# Altium PCB PCB1.PcbDoc (part 2 of 2)
Units mm, origin at the board's own origin, x right, y up, seen from the top; angles counter-clockwise.
Board outline 90 x 58.77 mm, 6 copper layers (L1, GND1, +3V3, 1.8V, GND, L6), stack 1.776 mm thick; 134 components, 89 nets, 660 pads, 134 vias.
Unrouted connection lines stored in the file: 40.
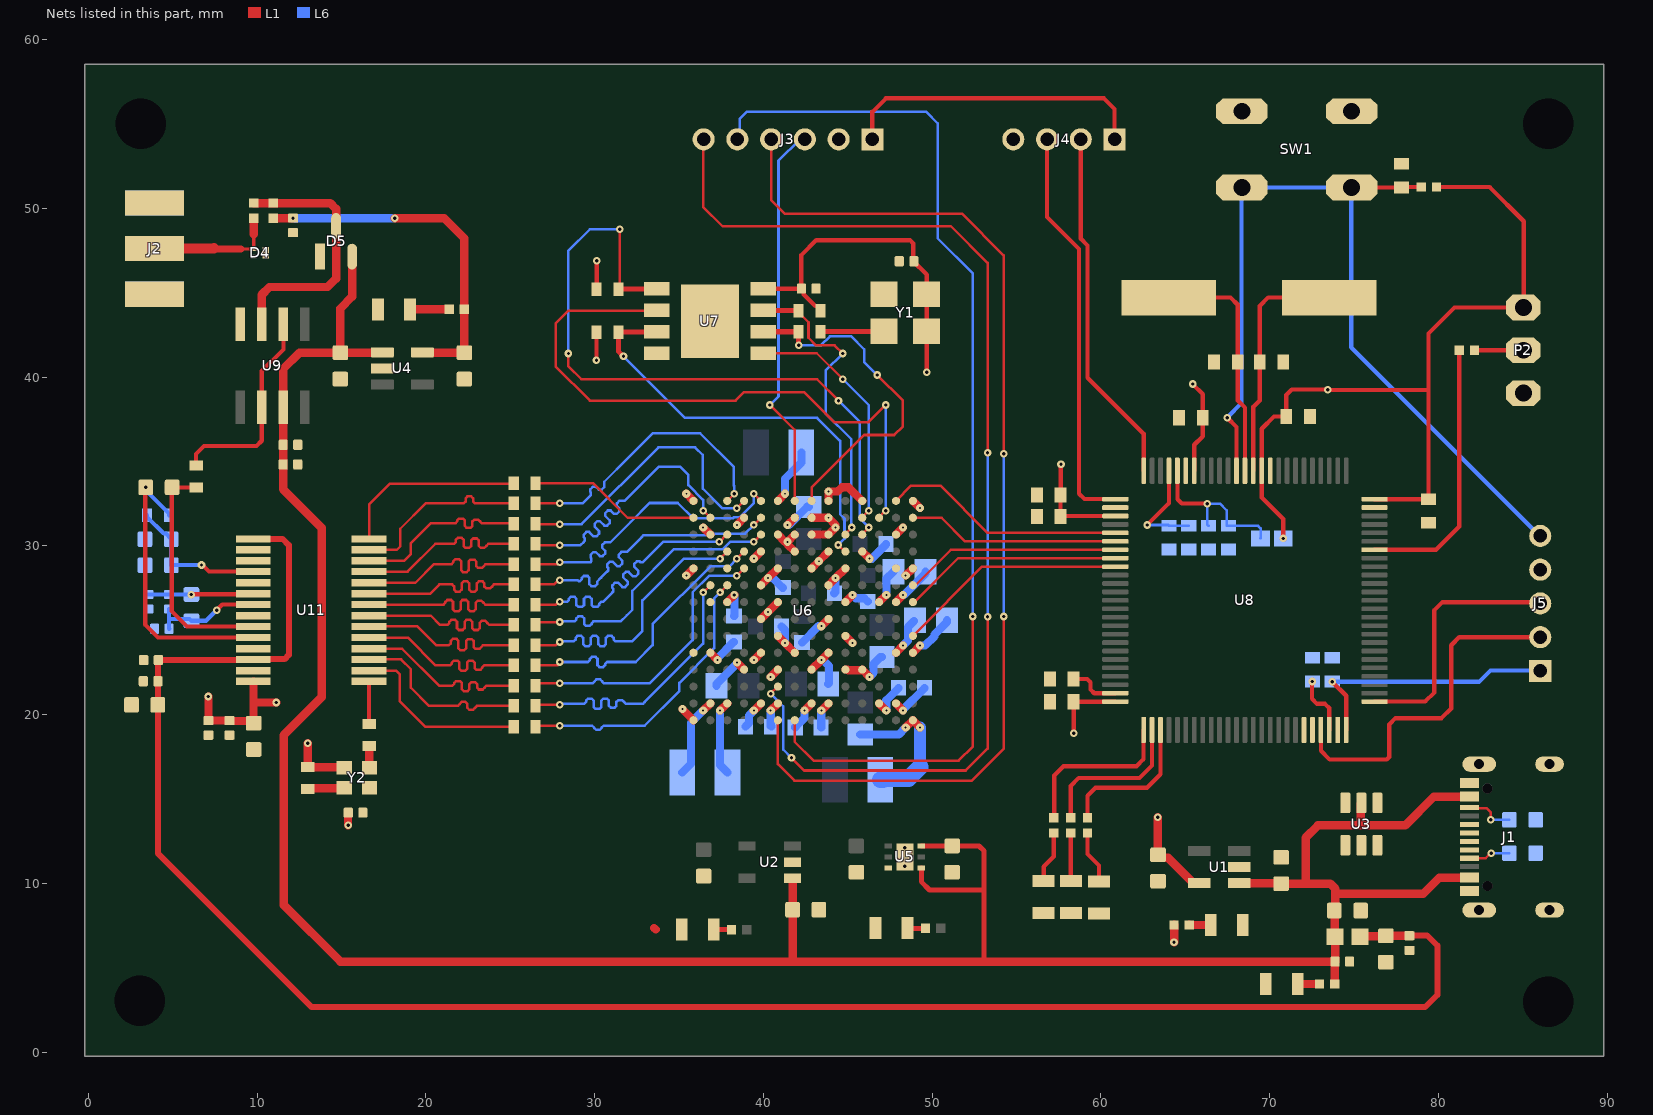
[diagram p6: the nets of this part, all layers, seen from the top]

## Via types
v1: diameter 0.45, hole 0.2, L1 to L6, 77 vias
v2: diameter 0.483, hole 0.114, L1 to L6, 57 vias

## Nets (pads, with @x,y where several pads share a name; then routed paths per layer and width w, separated by ;. In a path a pad name is that pad's centre, name@x,y a point inside that pad or via, vN(x,y) a via of type N, cw(c..) or ccw(c..) an arc to the next point about the centre after c; other vN are vias at no path point) (continued)
+3V3: C9.2 C26.2 C27.2 C28.2 C29.2 C30.2 C31.2 C32.2 C33.2 C34.2 C40.2 C41.2 C42.2 C48.2 C53.1 C54.1 C55.1 C56.1 C57.1 C58.1 C59.1 FB2.2 J3.1 J4.1 J5.1 P2.1 R3.2 R4.2 R5.2 R22.1 R27.1 R33.2 U1.5 U6.G2 U6.G13 U6.K2 U6.K13 U6.N2 U6.N6 U6.N8 U6.N13 U7.8 U8.11 U8.19 U8.28 U8.50 U8.75 U8.100 U11.28 Y1.1 Y1.4 Y2.4 | length 160.4
  L1 w0.254: Y2.4@15.136,16.896 Y2.4@15.159,16.873 ; v1(30.107,40.996) R4.2@30.107,42.671 ; R5.2@30.107,45.221 30.12,45.234 30.12,46.884 v1(30.132,46.896) ; U7.8@39.982,45.231 39.997,45.246 C33.2@42.25,45.246 ; R3.2@43.382,43.946 43.382,44.046 43.209,44.219 43.072,44.219 42.393,44.898 42.393,45.103 C33.2@42.25,45.246 ; J3.1@46.457,54.096 46.457,55.721 47.257,56.521 60.182,56.521 60.807,55.896 J4.1@60.807,54.096 ; v1(49.682,40.296) 49.682,42.716 Y1.4@49.677,42.721 Y1.1@49.677,44.921 49.677,46.078 48.882,46.873 48.882,47.921 48.682,48.121 43.132,48.121 42.25,47.239 C33.2@42.25,45.246 ; v1(57.632,34.846) 57.619,34.833 57.619,33.033 C59.1@57.607,33.021 C57.1@57.607,31.746 57.637,31.776 U8.28@60.852,31.776 ; v1(58.382,18.896) C58.1@58.382,20.771 58.387,20.776 U8.50@60.852,20.776 ; v1(65.432,39.596) 66.032,38.996 66.032,36.496 65.532,35.996 U8.19@65.532,34.456 ; v1(70.808,30.446) 70.808,31.595 69.532,32.871 U8.11@69.532,34.456 69.532,36.946 70.257,37.671 C55.1@70.982,37.671 70.982,38.946 71.307,39.271 73.407,39.271 v1(73.432,39.246) 79.382,39.246 79.407,39.271 ; v1(73.707,21.946) 74.532,21.121 U8.75@74.532,19.096 ; U8.100@76.212,32.776 76.215,32.773 79.405,32.773 C53.1@79.407,32.771 79.407,39.271 ; R27.1@79.882,51.271 83.032,51.271 85.057,49.246 85.057,44.161 P2.1@85.032,44.136 80.947,44.136 79.407,42.596 79.407,39.271
  L1 w0.483: v1(7.112,21.082) C41.2@7.112,19.651 C42.2@8.362,19.651 8.39,19.622 9.678,19.622 C40.2@9.799,19.501 ; C40.2@9.796,19.504 9.796,20.729 ; U11.28@9.796,21.954 9.796,20.729 ; v1(11.142,20.728) 9.797,20.728 9.796,20.729 ; v1@15.393,13.448 15.393,14.189 C48.2@15.4,14.196 ; v2(36.432,20.246) U6.N2@36.857,20.671 ; U6.K2@36.857,23.671 v2(37.282,23.246) ; v2(40.432,20.246) U6.N6@40.857,20.671 ; v2(42.432,20.246) U6.N8@42.857,20.671 ; U6.N13@47.857,20.671 v2(48.282,20.246) ; U6.K13@47.857,23.671 v2(48.282,24.096) ; U6.G13@47.857,26.671 v2(48.282,27.096)
  L1 w0.5: v1(13.01,18.306) 13.007,18.303 R22.1@13.007,16.896 Y2.4@15.136,16.896 ; v1(63.357,13.921) 63.357,11.726 63.567,11.516 63.987,11.516 65.397,10.106 65.397,10.071 65.447,10.021 U1.5@65.822,10.021 ; v1(64.332,6.521) R33.2@64.332,7.546
  L6 w0.254: v1(73.707,21.946) 82.403,21.946 83.078,22.62 86.008,22.62 J5.1@86.032,22.596
  L6 w0.483: C26.2@35.191,16.571 35.715,17.095 35.715,19.529 v2(36.432,20.246) ; v2(37.282,23.246) 37.282,23.346 38.237,24.301 C30.2@38.257,24.301 ; v2(40.432,20.246) 40.432,19.341 C32.2@40.477,19.296 ; C29.2@41.887,19.246 41.887,19.266 42.432,19.811 v2(42.432,20.246) ; v2(48.282,20.246) 48.282,20.314 49.538,21.57 C31.2@49.538,21.59 ; v2(48.282,24.096) 48.573,24.387 48.573,25.187 C27.2@48.932,25.546 ; v2(48.282,27.096) 48.332,27.096 49.607,28.371 C28.2@49.607,28.471
  other v1: 15.395,13.45
+3V3_OFFSET: C11.2 C67.2 R30.2 R32.2 U4.5 | length 21.1
  L1 w0.5: R30.2@10.949,49.419 10.954,49.424 v1(12.128,49.424) C67.2@12.132,49.428 ; v1(18.154,49.424) 21.079,49.424 22.282,48.221 R32.2@22.282,44.021 C11.2@22.282,41.451 ; U4.5@19.792,41.471 19.802,41.461 C11.2@22.272,41.461
  L6 w0.5: v1(12.128,49.424) v1(18.154,49.424) v1@18.157,49.421
+5V_ANALOG: C3.2 C4.2 C37.2 C38.2 C39.2 FB1.2 U11.15 U11.26 | length 115.8
  L1 w0.35: U11.15@9.778,30.412 11.516,30.412 11.882,30.046 11.882,23.546 11.632,23.296 9.799,23.296 U11.26@9.778,23.275 9.758,23.255 4.166,23.255 4.132,23.221 4.132,20.598 C37.2@4.119,20.584 4.119,11.784 13.232,2.671 79.207,2.671 79.932,3.396 79.932,6.321 79.332,6.921 78.3,6.921 C3.2@78.281,6.902
  L1 w0.5: FB1.2@75.342,6.846 75.369,6.874 76.855,6.874 C4.2@76.882,6.901 C4.2@76.882,6.901 C3.2@78.281,6.902
+5V_USB: C1.2 C2.2 C5.2 C8.2 C10.2 C12.2 C65.2 C66.2 D5.2 FB1.1 J1.A4_B9 J1.B4_A9 R31.2 U1.1 U2.1 U3.5 U4.1 U5.4 U5.6 U9.7 | length 164
  L1 w0.3: U2.1@41.727,10.313 U2.1@41.735,10.321 ; U5.4@49.357,10.921 49.357,10.108 49.844,9.621 53.082,9.621 ; U5.6@49.357,12.221 51.177,12.221 C5.2@51.182,12.226 52.777,12.226 53.082,11.921 53.082,9.621 ; 53.082,5.371 53.082,9.621
  L1 w0.5: U9.7@11.542,38.207 11.542,40.481 12.512,41.451 C12.2@14.932,41.451 ; C66.2@11.543,35.996 C65.2@11.543,34.832 11.543,33.36 13.832,31.071 13.832,21.046 11.582,18.796 11.582,8.721 14.932,5.371 53.082,5.371 C1.2@73.875,5.371 ; C66.2@11.543,35.996 U9.7@11.542,38.207 ; D5.2@15.632,47.146 15.632,44.771 14.932,44.071 C12.2@14.932,41.451 ; U4.1@17.422,41.471 17.412,41.461 14.942,41.461 C12.2@14.932,41.451 ; 41.727,5.664 U2.1@41.727,10.313 ; U1.1@68.192,10.021 68.207,10.006 70.667,10.006 C10.2@70.682,9.991 72.135,9.991 ; R31.2@73.857,4.046 73.866,4.055 73.866,5.362 C1.2@73.875,5.371 ; 73.932,9.396 79.107,9.396 80.057,10.346 80.682,10.346 J1.A4_B9@81.832,10.346 ; 75.407,13.446 75.387,13.466 75.387,14.731 U3.5@75.432,14.776 ; J1.B4_A9@81.832,15.146 79.732,15.146 78.032,13.446 72.857,13.446 72.135,12.724 72.135,9.991 ; 72.135,9.991 73.587,9.991 73.882,9.696 73.882,8.451 C2.2@73.827,8.396 73.849,8.374 73.849,6.869 FB1.1@73.872,6.846 73.873,6.845 73.873,5.373 C1.2@73.875,5.371
ADC_CLK: R23.1 U11.1 | length 2.5
  L1 w0.254: R23.1@16.632,19.446 16.632,21.976 U11.1@16.636,21.98
ADC_D0: R7.1 U6.A3 | length 17.1
  L1 w0.15: R7.1@26.507,32.521 v1@28.032,32.521 ; U6.A3@37.857,32.671 v1(38.282,33.096)
  L6 w0.15: v1@28.032,32.521 29.282,32.521 29.719,32.958 29.773,33.012 29.773,33.171 29.742,33.201 29.742,33.36 29.901,33.519 30.06,33.519 30.25,33.33 30.409,33.33 30.568,33.489 30.568,33.648 30.568,33.807 31.982,35.221 33.432,36.671 36.257,36.671 38.257,34.671 38.257,33.571 38.282,33.546 v1(38.282,33.096)
  other v1: 27.927,32.521
ADC_D1: R8.1 U6.A4 | length 17.1
  L1 w0.15: R8.1@26.507,31.321 26.532,31.296 v1@28.032,31.296 ; v1(38.432,32.246) U6.A4@38.857,32.671
  L6 w0.15: v1@28.032,31.296 29.232,31.296 33.782,35.846 35.957,35.846 36.407,35.396 36.407,33.396 37.557,32.246 v1(38.432,32.246)
  other v1: 27.927,31.296
ADC_D2: R9.1 U6.B2 | length 17.1
  L1 w0.15: R9.1@26.507,30.121 26.582,30.046 v1@28.057,30.046 ; v1(36.432,32.096) U6.B2@36.857,31.671
  L6 w0.15: v1@28.057,30.046 29.157,30.046 29.357,30.246 29.41,30.299 29.41,30.458 29.357,30.511 29.357,30.67 29.516,30.829 29.675,30.829 29.94,30.564 30.099,30.564 30.259,30.723 30.259,30.882 29.993,31.148 29.993,31.307 30.153,31.466 30.312,31.466 30.577,31.201 30.736,31.201 30.895,31.36 30.895,31.519 30.63,31.784 30.63,31.943 30.789,32.102 30.948,32.102 31.151,31.9 31.31,31.9 31.469,32.059 31.469,32.218 31.319,32.367 31.319,32.526 31.478,32.686 31.637,32.686 31.797,32.686 32.52,33.409 33.807,34.696 35.057,34.696 35.557,34.196 35.557,33.604 36.432,32.729 v1(36.432,32.096)
  other v1: 27.927,30.046
ADC_D3: R10.1 U6.A5 | length 17.4
  L1 w0.15: R10.1@26.507,28.921 27.801,28.921 v1@27.926,29.046 ; v1(27.927,29.046) v1@28.007,29.046 ; v1(39.432,33.096) U6.A5@39.857,32.671
  L6 w0.15: v1(27.927,29.046) 29.757,29.046 29.81,29.099 29.81,29.258 29.757,29.311 29.757,29.47 29.916,29.629 30.075,29.629 30.312,29.393 30.471,29.393 30.63,29.552 30.63,29.711 30.446,29.895 30.446,30.054 30.606,30.213 30.765,30.213 30.924,30.213 32.145,31.434 33.257,32.546 34.924,32.546 35.823,31.647 38.206,31.647 38.248,31.689 38.574,31.689 39.432,32.547 v1(39.432,33.096)
ADC_D4: R11.1 U6.B5 | length 17
  L1 w0.15: R11.1@26.507,27.721 27.59,27.721 27.846,27.977 v1(27.927,27.977) ; v1(39.432,31.246) U6.B5@39.857,31.671
  L6 w0.15: v1(27.927,27.977) 28.998,27.977 29.055,27.921 29.13,27.921 29.242,28.033 29.242,28.109 29.355,28.221 29.58,28.221 29.692,28.109 29.692,27.734 29.805,27.621 30.03,27.621 30.142,27.734 30.142,27.881 30.382,28.121 30.744,28.483 30.798,28.537 30.798,28.696 30.745,28.749 30.745,28.908 30.904,29.067 31.063,29.067 31.328,28.802 31.487,28.802 31.646,28.961 31.646,29.12 31.433,29.332 31.433,29.492 31.593,29.651 31.752,29.651 ; 31.752,29.65 31.911,29.65 32.801,30.54 32.899,30.638 36.885,30.638 36.979,30.732 38.918,30.732 v1(39.432,31.246)
ADC_D5: R12.1 U6.C3 | length 17
  L1 w0.15: R12.1@26.507,26.521 27.708,26.521 27.873,26.686 v1@27.954,26.686 ; v1(37.394,30.246) U6.C3@37.82,30.671 ; U6.C3@37.782,30.671 U6.C3@37.82,30.671 ; U6.C3@37.857,30.671 U6.C3@37.82,30.671
  L6 w0.15: v1@27.954,26.686 28.282,26.686 28.357,26.686 28.47,26.799 28.47,26.874 28.582,26.986 28.807,26.986 28.92,26.874 28.92,26.499 29.032,26.386 29.257,26.386 29.37,26.499 29.37,26.874 29.482,26.986 29.707,26.986 29.82,26.874 29.82,26.499 29.932,26.386 30.157,26.386 30.27,26.499 30.27,26.574 30.382,26.686 30.497,26.686 30.782,26.971 31.057,27.246 31.11,27.299 31.11,27.458 31.057,27.511 31.057,27.67 31.216,27.829 31.375,27.829 31.64,27.564 31.799,27.564 31.959,27.723 31.959,27.882 31.693,28.148 31.693,28.307 31.853,28.466 32.012,28.466 32.277,28.201 32.436,28.201 32.595,28.36 32.595,28.519 32.341,28.773 32.341,28.932 32.5,29.091 32.659,29.091 32.701,29.049 32.86,29.049 34.057,30.246 34.207,30.246 v1(37.394,30.246)
  other v1: 27.927,26.686
ADC_D6: R13.1 U6.C5 | length 17
  L1 w0.15: R13.1@26.507,25.321 26.68,25.494 v1@27.973,25.494 ; v1(39.432,30.246) U6.C5@39.857,30.671
  L6 w0.15: v1@27.973,25.494 28.01,25.531 28.734,25.531 28.809,25.531 28.921,25.643 28.921,25.718 29.034,25.831 29.259,25.831 29.371,25.718 29.371,25.372 29.484,25.259 29.709,25.259 29.821,25.372 29.821,25.418 29.934,25.531 31.542,25.531 31.907,25.896 32.232,26.221 32.232,27.346 34.703,29.817 37.602,29.817 38.031,30.246 v1(39.432,30.246)
  other v1: 27.927,25.494
ADC_D7: R14.1 U6.D3 | length 17
  L1 w0.15: R14.1@26.507,24.121 27.702,24.121 27.891,24.311 v1@27.973,24.311 ; v1(37.432,29.246) U6.D3@37.857,29.671
  L6 w0.15: v1@27.973,24.311 28.008,24.346 28.682,24.346 28.757,24.346 28.87,24.458 28.87,24.559 28.982,24.671 29.207,24.671 29.32,24.559 29.32,24.184 29.432,24.071 29.657,24.071 29.77,24.184 29.77,24.559 29.882,24.671 30.107,24.671 30.22,24.559 30.22,24.184 30.332,24.071 30.557,24.071 30.67,24.184 30.67,24.559 30.782,24.671 31.007,24.671 31.12,24.559 31.12,24.458 31.232,24.346 31.728,24.346 32.207,24.346 32.832,24.971 32.832,26.771 35.307,29.246 v1(37.432,29.246)
  other v1: 27.927,24.311
ADC_D8: R15.1 U6.D4 | length 16.7
  L1 w0.15: R15.1@26.507,22.921 27.795,22.921 27.998,23.124 v1@28.079,23.124 ; v1(38.432,29.246) U6.D4@38.857,29.671
  L6 w0.15: v1@28.079,23.124 29.532,23.124 29.607,23.124 29.72,23.236 29.72,23.311 29.832,23.424 30.057,23.424 30.17,23.311 30.17,22.936 30.282,22.824 30.507,22.824 30.62,22.936 30.62,23.011 30.732,23.124 32.356,23.124 32.435,23.124 33.432,24.121 33.432,25.369 36.859,28.796 37.982,28.796 v1(38.432,29.246)
  other v1: 27.927,23.124
ADC_D9: R16.1 U6.E4 | length 17.1
  L1 w0.15: R16.1@26.507,21.721 26.645,21.859 v1@28.021,21.859 ; v1(38.432,28.246) U6.E4@38.857,28.671
  L6 w0.15: v1@28.021,21.859 29.807,21.859 29.882,21.859 29.995,21.972 29.995,21.984 30.107,22.096 30.332,22.096 30.445,21.984 30.445,21.972 30.557,21.859 32.532,21.859 33.245,21.859 35.807,24.421 35.807,27.257 36.796,28.246 v1(38.432,28.246)
  other v1: 27.927,21.859
ADC_D10: R17.1 U6.F2 | length 17
  L1 w0.15: R17.1@26.507,20.521 26.58,20.594 v1@27.974,20.594 ; v1(36.432,27.246) U6.F2@36.857,27.671
  L6 w0.15: v1@27.974,20.594 28.025,20.646 29.307,20.646 29.382,20.646 29.495,20.758 29.495,20.833 29.607,20.946 29.832,20.946 29.945,20.833 29.945,20.458 30.057,20.346 30.282,20.346 30.395,20.458 30.395,20.833 30.507,20.946 30.732,20.946 30.845,20.833 30.845,20.529 30.957,20.417 31.182,20.417 31.295,20.529 31.295,20.759 31.407,20.871 31.632,20.871 31.745,20.759 31.857,20.646 32.857,20.646 32.957,20.746 36.432,24.221 v1(36.432,27.246)
  other v1: 27.927,20.594
ADC_D11: R18.1 U6.F3 | length 17
  L1 w0.15: R18.1@26.507,19.296 26.564,19.353 v1(27.927,19.353) v1@28.009,19.353 ; v1(37.432,27.246) U6.F3@37.857,27.671
  L6 w0.15: v1@28.009,19.353 28.016,19.346 29.332,19.346 29.857,19.346 29.97,19.233 29.97,19.222 30.082,19.109 30.307,19.109 30.42,19.222 30.42,19.233 30.532,19.346 32.732,19.346 32.957,19.346 35.019,21.408 35.019,21.89 37.082,23.953 37.082,26.896 v1(37.432,27.246)
ADC_OTR: R19.2 U6.B1 | length 10.2
  L1 w0.15: R19.2@26.507,33.721 29.907,33.721 31.957,31.671 34.976,31.671 U6.B1@35.857,31.671
bit1: R7.2 U11.13 | length 10.9
  L1 w0.15: U11.13@16.636,29.777 18.288,29.777 18.482,29.971 18.482,31.021 19.982,32.521 22.163,32.521 22.238,32.521 22.351,32.634 22.351,32.82 22.463,32.933 22.688,32.933 22.801,32.82 22.801,32.634 22.913,32.521 25.188,32.521 R7.2@25.207,32.521
bit2: R8.2 U11.12 | length 10.9
  L1 w0.15: U11.12@16.636,29.117 18.703,29.117 19.107,29.521 19.107,30.171 20.276,31.34 21.669,31.34 21.745,31.34 21.857,31.453 21.857,31.505 21.969,31.618 22.194,31.618 22.307,31.505 22.307,31.187 22.419,31.074 22.644,31.074 22.757,31.187 22.757,31.453 22.869,31.565 23.094,31.565 23.207,31.453 23.319,31.34 24.807,31.34 25.188,31.34 R8.2@25.207,31.321
bit3: R9.2 U11.11 | length 10.9
  L1 w0.15: U11.11@16.636,28.482 18.918,28.482 20.557,30.121 21.594,30.121 21.67,30.121 21.782,30.234 21.782,30.371 21.895,30.484 22.12,30.484 22.232,30.371 22.232,29.996 22.344,29.884 22.57,29.884 22.682,29.996 22.682,30.329 22.794,30.442 23.019,30.442 23.132,30.329 23.132,30.008 23.244,29.896 23.469,29.896 23.582,30.008 23.694,30.121 24.884,30.121 R9.2@25.207,30.121
bit4: R10.2 U11.10 | length 10.9
  L1 w0.15: U11.10@16.636,27.822 19.382,27.821 20.482,28.921 21.446,28.921 21.521,28.921 21.633,29.034 21.633,29.108 21.746,29.221 21.971,29.221 22.083,29.108 22.083,28.566 22.196,28.453 22.421,28.453 22.533,28.566 22.533,29.074 22.646,29.186 22.871,29.186 22.983,29.074 22.983,28.808 23.096,28.696 23.321,28.696 23.433,28.808 23.546,28.921 24.632,28.921 R10.2@25.207,28.921
bit5: R11.2 U11.9 | length 10.9
  L1 w0.15: U11.9@16.636,27.161 16.641,27.166 20.252,27.166 20.807,27.721 21.032,27.721 21.557,27.721 21.669,27.609 21.669,27.408 21.782,27.296 22.007,27.296 22.119,27.408 22.119,27.783 22.232,27.896 22.457,27.896 22.569,27.783 22.569,27.408 22.682,27.296 22.907,27.296 23.019,27.408 23.019,27.783 23.132,27.896 23.357,27.896 23.469,27.783 23.469,27.597 23.582,27.485 23.807,27.485 23.919,27.597 23.919,27.609 24.032,27.721 24.172,27.721 R11.2@25.207,27.721
bit6: R12.2 U11.8 | length 10.9
  L1 w0.15: U11.8@16.636,26.526 20.969,26.526 21.045,26.526 21.157,26.639 21.157,26.686 21.27,26.799 21.495,26.799 21.607,26.686 21.607,26.24 21.72,26.128 21.945,26.128 22.057,26.24 22.057,26.686 22.17,26.799 22.395,26.799 22.507,26.686 22.507,26.256 22.62,26.143 22.845,26.143 22.957,26.256 22.957,26.639 23.069,26.751 23.295,26.751 23.407,26.639 23.519,26.526 25.122,26.526 25.202,26.526 R12.2@25.207,26.521
bit7: R13.2 U11.7 | length 10.9
  L1 w0.15: U11.7@16.636,25.866 20.297,25.866 20.841,25.321 21.207,25.321 21.282,25.321 21.395,25.434 21.395,25.509 21.507,25.621 21.732,25.621 21.845,25.509 21.845,25.134 21.957,25.021 22.182,25.021 22.295,25.134 22.295,25.509 22.407,25.621 22.632,25.621 22.745,25.509 22.745,25.134 22.857,25.021 23.082,25.021 23.195,25.134 23.195,25.447 23.307,25.56 23.532,25.56 23.645,25.447 23.645,25.434 23.757,25.321 24.232,25.321 25.184,25.321 R13.2@25.207,25.321
bit8: R14.2 U11.6 | length 10.9
  L1 w0.15: U11.6@16.636,25.231 19.497,25.231 20.607,24.121 21.294,24.121 21.37,24.121 21.482,24.233 21.482,24.378 21.595,24.49 21.82,24.49 21.932,24.378 21.932,23.934 22.044,23.821 22.27,23.821 22.382,23.934 22.382,24.37 22.494,24.483 22.719,24.483 22.832,24.37 22.832,24.008 22.944,23.896 23.169,23.896 23.282,24.008 23.394,24.121 24.594,24.121 R14.2@25.207,24.121
bit9: R15.2 U11.5 | length 10.9
  L1 w0.15: U11.5@16.636,24.57 18.933,24.57 20.582,22.921 21.351,22.921 21.426,22.921 21.538,23.033 21.538,23.09 21.651,23.202 21.876,23.202 21.988,23.09 21.988,22.715 22.101,22.602 22.326,22.602 22.438,22.715 22.438,23.09 22.551,23.202 22.776,23.202 22.888,23.09 22.888,22.771 23.001,22.658 23.226,22.658 23.338,22.771 23.338,22.808 23.451,22.921 24.331,22.921 R15.2@25.207,22.921
bit10: R16.2 U11.4 | length 10.9
  L1 w0.15: U11.4@16.636,23.91 18.593,23.91 20.782,21.721 21.494,21.721 21.57,21.721 21.682,21.833 21.682,21.883 21.795,21.996 22.02,21.996 22.132,21.883 22.132,21.508 22.244,21.396 22.47,21.396 22.582,21.508 22.582,21.816 22.694,21.928 22.919,21.928 23.032,21.816 23.032,21.608 23.144,21.496 23.369,21.496 23.482,21.608 23.594,21.721 24.434,21.721 R16.2@25.207,21.721
bit11: R17.2 U11.3 | length 10.9
  L1 w0.15: U11.3@16.636,23.275 18.528,23.275 19.107,22.696 19.107,21.598 20.184,20.521 21.819,20.521 21.895,20.521 22.007,20.634 22.007,20.645 22.12,20.758 22.345,20.758 22.457,20.645 22.457,20.408 22.57,20.296 22.795,20.296 22.907,20.408 23.019,20.521 24.669,20.521 R17.2@25.207,20.521
bit12: R18.2 U11.2 | length 10.9
  L1 w0.15: U11.2@16.636,22.615 18.238,22.615 18.457,22.396 18.457,20.796 19.957,19.296 R18.2@25.207,19.296
boot: R28.1 U8.94 | length 16
  L1 w0.25: U8.94@76.212,29.776 79.861,29.776 81.232,31.147 R28.1@81.232,41.596
FLASH_CLK: R6.1 U6.A8 U7.6 | length 20.5
  L1 w0.156: U6.A8@42.857,32.671 42.857,33.459 45.974,36.576 47.752,36.576 48.26,37.084 48.26,38.608 v1(46.736,40.132)
  L1 w0.3: U7.6@39.982,42.691 39.984,42.694 42.079,42.694 R6.1@42.082,42.696 42.085,42.693 42.085,41.905 v1(42.088,41.902)
  L6 w0.15: v1(42.088,41.902) 43.426,41.902 43.942,42.418 45.212,42.418 45.974,41.656 45.974,40.894 v1(46.736,40.132)
FLASH_CS: R5.1 U6.C11 U6.E13 U7.1 | length 42
  L1 w0.15: v1(28.448,41.402) 28.448,40.64 29.21,39.878 43.18,39.878 v1(44.45,38.608) ; R5.1@31.407,45.221 31.496,45.31 v1(31.496,48.768) ; U6.C11@45.819,30.671 v1(46.244,31.096)
  L1 w0.3: R5.1@31.407,45.221 31.412,45.226 33.677,45.226 U7.1@33.682,45.231
  L6 w0.15: v1(28.448,41.402) 28.448,47.498 29.718,48.768 v1(31.496,48.768) ; v1(44.45,38.608) 45.72,37.338 45.72,31.621 v1(46.244,31.096)
FLASH_HOLD: R3.1 U6.C10 U7.7 | length 18.3
  L1 w0.15: R3.1@42.082,43.846 42.672,43.256 42.672,42.34 43.127,41.885 44.221,41.885 v1(44.704,41.402) ; U6.C10@44.819,30.671 v1(45.244,31.096)
  L1 w0.3: U7.7@39.982,43.961 39.99,43.954 42.074,43.954 R3.1@42.082,43.946 R3.1@42.082,43.846
  L6 w0.15: v1(44.704,41.402) 43.688,40.386 43.688,37.846 45.212,36.322 45.212,31.129 v1(45.244,31.096)
FLASH_MISO: U6.B12 U7.2 | length 37.5
  L1 w0.15: U7.2@33.682,43.961 33.663,43.942 28.448,43.942 27.686,43.18 27.686,40.64 29.718,38.608 38.354,38.608 38.862,39.116 42.418,39.116 44.196,37.338 46.228,37.338 v1(47.244,38.354) ; U6.B12@46.819,31.671 v1(47.244,32.096)
  L6 w0.15: v1(47.244,32.096) v1(47.244,38.354)
FLASH_MOSI: U6.B11 U7.5 | length 14.4
  L1 w0.15: U7.5@39.982,41.421 43.161,41.421 v1(44.704,39.878) ; U6.B11@45.819,31.671 v1(46.244,32.096)
  L6 w0.15: v1(44.704,39.878) 46.244,38.338 v1(46.244,32.096)
FLASH_WP: R4.1 U6.D10 U7.3 | length 25.8
  L1 w0.15: v1(44.432,30.058) U6.D10@44.857,29.633
  L1 w0.3: v1(31.711,41.233) 31.407,41.536 R4.1@31.407,42.671 31.417,42.681 33.672,42.681 U7.3@33.682,42.691
  L6 w0.15: v1(31.711,41.233) 35.351,37.592 43.18,37.592 44.547,36.225 44.547,31.881 44.806,31.623 44.806,30.432 v1(44.432,30.058)
FPGA_STM_CS: U6.G14 U8.33 | length 13.1
  L1 w0.15: U6.G14@48.857,26.671 48.941,26.671 51.546,29.276 U8.33@60.852,29.276
FPGA_STM_IRQ: U6.J14 U8.34 | length 13.7
  L1 w0.15: U6.J14@48.857,24.671 52.962,28.776 53.687,28.776 U8.34@60.852,28.776
FPGA_STM_MISO: U6.B14 U8.31 | length 12.6
  L1 w0.15: U6.B14@48.857,31.671 50.557,31.671 51.952,30.276 U8.31@60.852,30.276
FPGA_STM_MOSI: U6.F14 U8.32 | length 12.9
  L1 w0.15: U6.F14@48.857,27.671 49.011,27.671 51.116,29.776 U8.32@60.852,29.776
FPGA_STM_SCK: U6.A13 U8.30 | length 14.5
  L1 w0.15: U6.A13@47.857,32.671 48.757,33.571 50.482,33.571 53.277,30.776 U8.30@60.852,30.776
GND: C1.1 C2.1 C3.1 C4.1 C5.1 C6.1 C7.1 C8.1 C9.1 C10.1 C11.1 C12.1 C13.1 C14.1 C15.1 C16.1 C17.1 C18.1 C19.1 C20.1 C21.1 C22.1 C23.1 C24.1 C25.1 C26.1 C27.1 C28.1 C29.1 C30.1 C31.1 C32.1 C33.1 C34.1 C35.1 C36.1 C37.1 C38.1 C39.1 C40.1 C41.1 C42.1 C45.1 C46.1 C48.1 C49.2 C50.2 C51.2 C52.2 C53.2 C54.2 C55.2 C56.2 C57.2 C58.2 C59.2 C60.2 C61.2 C62.1 C63.1 C64.2 C65.1 C66.1 C67.1 D1.1 D2.1 D3.1 D4.3 D5.1 D6.1 D7.1 D8.1 D9.1 D10.1 J1.A1_B12 J1.B1_A12 J1.S1 J1.S2 J1.S3 J1.S4 J2.G1 J2.G2 J2.G3 J2.G4 J3.2 J4.4 J5.4 P2.3 R1.1 R2.1 SW1.2 U1.2 U2.2 U3.2 U4.2 U5.3 U5.7 U6.A1 U6.A6 U6.A9 U6.A11 U6.A14 U6.B4 U6.B7 U6.B8 U6.B9 U6.C2 U6.C6 U6.C7 U6.C8 U6.C9 U6.C13 U6.D5 U6.D7 U6.D9 U6.D11 U6.E1 U6.E3 U6.E6 U6.E8 U6.E10 U6.E14 U6.F5 U6.F9 U6.G3 U6.G6 U6.G10 U6.G12 U6.H5 U6.H9 U6.J6 U6.J10 U6.K1 U6.K5 U6.K7 U6.K9 U6.K14 U6.L4 U6.L6 U6.L8 U6.L10 U6.L11 U6.N3 U6.N5 U6.N9 U6.N12 U6.P1 U6.P14 U7.4 U7.9 U8.10 U8.20 U8.27 U8.74 U8.99 U9.4 U11.16 U11.17 U11.19 U11.22 U11.25 U11.27 Y1.2 Y2.2 | length 72.7
  L1 w0.483: 33.528,7.366 33.623,7.271 ; v2(35.204,20.345) 35.204,20.324 U6.P1@35.857,19.671 ; v2(35.432,28.246) U6.E1@35.857,28.671 ; v2(35.432,33.096) U6.A1@35.857,32.671 ; v2(36.432,31.096) U6.C2@36.857,30.671 ; v2(37.432,20.246) U6.N3@37.857,20.671 ; U6.G3@37.857,26.671 v1(38.282,27.096) ; v2(38.432,23.096) U6.L4@38.857,22.671 ; v2(38.432,31.246) U6.B4@38.857,31.671 ; v2(39.432,20.246) U6.N5@39.857,20.671 ; v2(39.432,23.246) U6.K5@39.857,23.671 ; v2(39.432,29.246) U6.D5@39.857,29.671 ; U6.H5@39.857,25.671 v2(40.282,26.096) U6.G6@40.857,26.671 ; U6.F5@39.857,27.671 v2(40.282,28.096) U6.E6@40.857,28.671 ; v2(40.432,22.246) U6.L6@40.857,22.671 ; U6.J6@40.857,24.671 v2(41.282,24.246) U6.K7@41.857,23.671 ; U6.C6@40.857,30.671 41.282,30.246 v2(41.432,30.246) ; U6.A6@40.857,32.671 v2(41.282,33.096) ; v2(41.432,31.246) U6.B7@41.857,31.671 ; U6.D7@41.857,29.671 41.432,30.096 v2(41.432,30.246) ; U6.C7@41.857,30.671 v2(41.432,30.246) ; U6.L8@42.857,22.671 v2(43.432,23.246) U6.K9@43.857,23.671 ; U6.E8@42.857,28.671 v2(43.282,29.096) U6.D9@43.857,29.671 ; U6.C8@42.857,30.671 U6.C9@43.857,30.671 v2(44.282,31.096) 44.282,31.246 v2(43.857,31.671) U6.B8@42.857,31.671 ; v2(43.432,20.246) U6.N9@43.857,20.671 ; v2(43.432,25.246) U6.H9@43.857,25.671 ; U6.F9@43.857,27.671 v2(44.282,28.096) U6.E10@44.857,28.671 ; U6.A9@43.857,32.671 43.857,33.214 v2(43.866,33.223) 44.399,33.223 44.652,33.476 45.052,33.476 U6.A11@45.857,32.671 ; U6.L10@44.857,22.671 44.995,22.671 45.029,22.636 45.822,22.636 U6.L11@45.857,22.671 v2(46.282,22.246) ; U6.J10@44.857,24.671 v2(45.282,24.246) ; U6.G10@44.857,26.671 v2(45.282,27.096) ; U6.D11@45.857,29.671 v2(46.282,29.246) ; U6.N12@46.857,20.671 v2(47.282,20.246) ; U6.G12@46.857,26.671 v2(47.282,27.096) ; U6.C13@47.857,30.671 v2(48.282,31.096) ; v2(48.432,19.246) U6.P14@48.857,19.671 v2(49.282,19.246) ; v2(48.432,28.246) U6.E14@48.857,28.671 ; U6.K14@48.857,23.671 v2(49.282,24.096) ; U6.A14@48.857,32.671 v2(49.282,32.246)
  L6 w0.483: C22.1@37.22,21.721 37.22,21.821 38.432,23.033 v2(38.432,23.096) ; v2(37.432,20.246) 37.432,17.012 C26.1@37.873,16.571 ; C30.1@38.257,25.841 38.282,25.866 v1(38.282,27.096) ; C32.1@38.937,19.296 39.141,19.5 39.141,19.955 v2(39.432,20.246) ; v2(40.282,28.096) 40.567,28.096 41.137,27.526 C19.1@41.157,27.526 ; C23.1@41.072,25.229 41.276,25.025 41.276,24.252 v2(41.282,24.246) ; v2(41.282,33.096) 41.282,33.985 42.248,34.951 C20.1@42.248,35.546 ; v2(41.432,31.246) 41.52,31.246 42.596,32.322 C18.1@42.696,32.322 ; C25.1@42.282,24.276 42.302,24.276 43.272,25.246 v2(43.432,25.246) ; C29.1@43.427,19.246 43.432,19.251 v2(43.432,20.246) ; v2(43.432,23.246) 43.531,23.246 43.891,22.885 43.891,21.87 C21.1@43.842,21.821 ; C16.1@44.202,27.196 44.282,27.276 v2(44.282,28.096) ; v2(45.282,27.096) 45.473,26.905 45.978,26.905 C15.1@46.182,26.701 ; C14.1@45.741,18.837 48.023,18.837 v2(48.432,19.246) ; v2(46.282,22.246) 46.52,22.484 46.52,23.009 46.928,23.417 C17.1@47.028,23.417 ; v2(46.282,29.246) 46.429,29.246 47.274,30.091 C24.1@47.274,30.111 ; v2(47.282,20.246) 47.282,20.854 47.998,21.57 C31.1@47.998,21.59 ; v2(47.282,27.096) 47.298,27.112 47.298,28.062 C28.1@47.707,28.471 ; v2(49.282,24.096) 49.582,24.096 50.132,24.646 50.132,24.746 50.882,25.496 C27.1@50.882,25.596
  L6 w0.7: 49.282,16.908 v2(49.282,19.246)
  L6 w1: C13.1@46.923,16.146 47.105,16.146 47.188,16.229 48.602,16.229 49.282,16.908
JTAG_TCK: J3.3 U6.A7 | length 23.1
  L1 w0.15: v1(40.386,38.354) 41.857,36.883 U6.A7@41.857,32.671
  L6 w0.15: v1(40.386,38.354) 40.894,38.862 40.894,52.832 42.158,54.096 J3.3@42.457,54.096
JTAG_TDI: J3.5 U6.P7 | length 63.9
  L1 w0.15: U6.P7@41.857,19.671 41.857,18.392 42.974,17.276 51.562,17.276 52.407,18.121 v1(52.407,25.821)
  L6 w0.15: J3.5@38.457,54.096 38.586,54.225 38.586,55.3 39.007,55.721 49.657,55.721 50.332,55.046 50.332,48.221 52.407,46.146 v1(52.407,25.821)
JTAG_TDO: J3.4 U6.P6 | length 65.1
  L1 w0.15: J3.4@40.457,54.096 40.457,50.496 41.257,49.696 51.757,49.696 54.232,47.221 v1(54.232,35.471) ; U6.P6@40.857,19.671 40.857,17.079 41.84,16.096 52.357,16.096 54.232,17.971 v1(54.232,25.821)
  L6 w0.15: v1(54.232,25.821) v1(54.232,35.471)
JTAG_TMS: J3.6 U6.M6 | length 68.4
  L1 w0.15: J3.6@36.457,54.096 36.432,54.071 36.432,50.096 37.582,48.946 51.107,48.946 53.282,46.771 v1(53.282,35.521) ; v1(40.432,21.246) U6.M6@40.857,21.671 ; v1(41.662,17.443) 42.41,16.696 51.982,16.696 53.282,17.996 v1(53.282,25.81)
  L6 w0.15: v1(40.432,21.246) 41.178,20.5 41.178,17.928 v1(41.662,17.443) ; v1(53.282,25.81) v1(53.282,35.521)
led_blue: R26.1 U8.51 | length 9.9
  L1 w0.25: R26.1@57.209,13.891 57.232,13.913 57.232,16.396 57.782,16.946 62.107,16.946 62.528,17.367 62.528,19.092 U8.51@62.532,19.096
led_green: R25.1 U8.52 | length 8.5
  L1 w0.25: R25.1@58.209,13.891 58.209,15.773 58.682,16.246 62.282,16.246 63.032,16.996 63.032,18.296
led_red: R24.1 U8.53 | length 8.8
  L1 w0.25: R24.1@59.209,13.891 59.207,13.893 59.207,15.196 59.682,15.671 62.732,15.671 63.536,16.475 63.536,19.092 U8.53@63.532,19.096
MCU_D_N: U3.6 U8.70
MCU_D_P: U3.4 U8.71
NetC35_2: C35.2 C36.2 R21.1 U11.18 | length 8.7
  L1 w0.25: v1(6.707,28.871) 6.761,28.871 7.15,28.482 U11.18@9.778,28.482
  L6 w0.25: R21.1@3.482,31.821 3.482,31.721 4.467,30.736 4.602,30.736 4.912,30.426 C36.2@4.912,30.396 4.915,30.393 4.915,28.862 C35.2@4.918,28.859 4.93,28.871 v1(6.707,28.871)
NetC43_1: C43.1 C44.1 C46.2 U11.21 | length 6.6
  L1 w0.25: v1(7.607,26.196) 7.937,26.526 U11.21@9.778,26.526
  L6 w0.25: C44.1@4.782,26.264 4.786,26.261 4.786,25.68 ; C46.2@4.789,25.096 4.786,25.099 4.786,25.68 ; v1(7.607,26.196) 6.977,25.566 C43.1@6.107,25.566 5.993,25.68 4.786,25.68
NetC43_2: C43.2 C44.2 C45.2 U11.20 | length 6.2
  L1 w0.25: v1(6.107,27.121) 6.127,27.141 9.758,27.141 U11.20@9.778,27.161
  L6 w0.25: C45.2@3.557,27.128 C44.2@4.782,27.128 ; C44.2@4.782,27.128 C43.2@6.107,27.126
NetC60_1: C60.1 U8.49 | length 3.1
  L1 w0.254: C60.1@58.382,22.121 59.182,22.121 59.382,21.921 59.382,21.496 59.602,21.276 U8.49@60.852,21.276
NetC61_1: C61.1 U8.73 | length 3.6
  L1 w0.25: v1(72.532,21.971) 72.507,21.946 72.507,20.946 72.807,20.646 73.282,20.646 73.532,20.396 U8.73@73.532,19.096
NetC62_2: C62.2 U8.12 Y3.2 | length 14.3
  L1 w0.254: U8.12@69.032,34.456 69.032,38.246 69.407,38.621 C62.2@69.407,40.896 69.407,44.221 69.907,44.721 Y3.2@73.532,44.721
NetC63_2: C63.2 U8.13 Y3.1 | length 14.3
  L1 w0.25: Y3.1@64.032,44.721 67.682,44.721 68.107,44.296 C63.2@68.107,40.896 68.107,38.621 68.532,38.196 U8.13@68.532,34.456
NetD1_2: D1.2 R31.1 | length 1.3
  L1 w0.5: D1.2@71.662,4.041 71.665,4.043 72.954,4.043 R31.1@72.957,4.046
NetD2_2: D2.2 R32.1 | length 2.3
  L1 w0.5: D2.2@19.057,44.021 R32.1@21.382,44.021
NetD3_2: D3.2 R33.1 | length 1.3
  L1 w0.5: R33.1@65.232,7.546 65.236,7.542 66.501,7.542 D3.2@66.505,7.539
NetD4_1: D4.1 J2.1 R29.2 | length 7.7
  L1 w0.2: 9.039,47.596 D4.1@9.807,47.596 9.807,48.463 9.794,48.477
  L1 w0.4: 7.438,47.638 7.48,47.596 9.039,47.596
  L1 w0.5: 9.794,48.477 9.807,48.49 R29.2@9.807,49.421
  L1 w0.6: J2.1@3.932,47.621 7.422,47.621 7.438,47.638
NetD5_3: D5.3 R29.1 R30.1 U9.3 | length 15.7
  L1 w0.5: R29.1@9.807,50.321 R30.1@10.949,50.32 ; U9.3@10.272,43.135 10.272,44.886 10.732,45.346 14.182,45.346 14.682,45.846 D5.3@14.682,48.966 14.682,49.971 14.334,50.319 R30.1@10.949,50.319
NetD6_2: D6.2 R34.1 | length 1.1
  L1 w0.3: D6.2@37.057,7.271 37.063,7.265 R34.1@38.107,7.265
NetD7_2: D7.2 R35.1 | length 1.1
  L1 w0.3: D7.2@48.541,7.352 48.547,7.346 R35.1@49.607,7.346
NetD8_2: D8.2 R24.2 | length 3.1
  L1 w0.25: R24.2@59.209,12.991 59.209,11.744 59.882,11.071 D8.2@59.882,10.121
NetD9_2: D9.2 R25.2 | length 2.9
  L1 w0.25: R25.2@58.209,12.991 58.209,10.169 D9.2@58.232,10.146
NetD10_2: D10.2 R26.2 | length 3.1
  L1 w0.25: D10.2@56.607,10.146 56.607,10.996 57.207,11.596 57.207,12.988 R26.2@57.209,12.991
NetJ1_A5: J1.A5 R1.2 | length 2.5
  L1 w0.15: J1.A5@81.832,11.496 82.796,11.496 83.096,11.796 v1(83.132,11.796)
  L6 w0.15: v1(83.132,11.796) R1.2@84.202,11.796
NetJ1_B5: J1.B5 R2.2 | length 2.9
  L1 w0.15: J1.B5@81.832,14.496 81.857,14.471 82.838,14.471 83.107,14.203 v1(83.107,13.771)
  L6 w0.15: v1(83.107,13.771) R2.2@84.202,13.771
NetP2_2: P2.2 R28.2 | length 2.9
  L1 w0.25: R28.2@82.132,41.596 P2.2@85.032,41.596
NetR6_2: R6.2 Y1.3 | length 3.8
  L1 w0.3: R6.2@43.382,42.696 47.112,42.696 Y1.3@47.137,42.721
NetR19_1: R19.1 U11.14 | length 11.1
  L1 w0.15: U11.14@16.636,30.412 16.636,32.45 17.882,33.696 25.182,33.696 R19.1@25.207,33.721
NetR22_2: R22.2 Y2.1 | length 2.2
  L1 w0.5: R22.2@13.007,15.596 13.046,15.635 15.121,15.635 Y2.1@15.159,15.673
NetR23_2: R23.2 Y2.3 | length 1.3
  L1 w0.5: R23.2@16.632,18.146 16.646,18.132 16.646,16.886 Y2.3@16.659,16.873
reset: C64.1 J5.5 R27.2 SW1.1 U8.14 | length 53.3
  L1 w0.25: v1(67.482,37.596) 68.032,37.046 U8.14@68.032,34.456 ; SW1.1@74.858,51.235 77.796,51.235 C64.1@77.807,51.246 77.832,51.271 R27.2@78.982,51.271
  L6 w0.25: v1(67.482,37.596) 67.482,37.622 68.33,38.47 68.33,51.209 SW1.1@68.356,51.235 SW1.1@74.858,51.235 74.832,51.209 74.832,41.77 86.006,30.596 J5.5@86.032,30.596
SIGNAL_IN: R20.2 U9.2 U9.6 | length 12.3
  L1 w0.25: R20.2@6.382,34.771 6.382,35.446 6.857,35.921 9.957,35.921 10.272,36.236 U9.6@10.272,38.207 10.272,40.361 11.557,41.646 11.557,43.12 U9.2@11.542,43.135
SWCLK: J5.3 U8.76 | length 15.1
  L1 w0.25: U8.76@76.212,20.776 79.212,20.776 79.757,21.321 79.757,26.196 80.232,26.671 85.957,26.671 J5.3@86.032,26.596
SWDIO: J5.2 U8.72 | length 20.8
  L1 w0.25: U8.72@73.032,19.096 73.032,17.866 73.552,17.346 76.936,17.346 77.082,17.492 77.082,19.421 77.457,19.796 80.182,19.796 80.757,20.371 80.757,24.121 81.232,24.596 J5.2@86.032,24.596
USART_LOG_RX: J4.3 U8.26 | length 24.1
  L1 w0.25: J4.3@56.807,54.096 56.807,49.496 58.707,47.596 58.707,33.096 59.027,32.776 U8.26@60.852,32.776
USART_LOG_TX: J4.2 U8.25 | length 21.2
  L1 w0.25: J4.2@58.807,54.096 58.807,48.209 59.211,47.805 59.211,39.967 62.532,36.646 U8.25@62.532,34.456
USB_D_N: J1.A7 J1.B7 U3.1
USB_D_P: J1.A6 J1.B6 U3.3
VDDA: C49.1 C50.1 C51.1 C52.1 FB2.1 U8.21 U8.22 | length 16.1
  L1 w0.25: v1(62.738,31.242) 64.032,32.536 U8.22@64.032,34.456 ; U8.21@64.532,34.456 64.532,32.771 64.791,32.512 v1(66.294,32.512)
  L6 w0.15: v1(62.738,31.242) 63.986,31.242 C52.1@64.032,31.196 C51.1@65.207,31.196 ; C49.1@66.382,31.196 66.294,31.284 v1(66.294,32.512) 67.056,32.512 67.457,32.111 67.457,31.196 69.307,31.196 69.457,31.046 FB2.1@69.456,30.446 FB2.1@69.456,30.446
VINA: C47.2 R20.1 U11.23 | length 14
  L1 w0.25: C47.2@4.935,33.471 4.935,33.221 4.937,33.219 4.937,26.141 5.847,25.231 U11.23@9.778,25.231 ; C47.2@4.962,33.471 R20.1@6.382,33.471
VINB: C47.1 R21.2 U11.24 | length 17.1
  L1 w0.25: C47.1@3.377,33.471 3.377,25.326 4.133,24.57 U11.24@9.778,24.57
  L6 w0.25: v1(3.402,33.471) 3.44,33.433 3.44,33.263 4.782,31.921 R21.2@4.782,31.821
pads on no net: D4.2 J1. J1.A8 J1.B8 U1.4 U2.4 U4.3 U4.4 U5.2 U5.5 U5.8 U5.9 U6.A2 U6.A10 U6.A12 U6.B3 U6.B6 U6.B10 U6.B13 U6.C1 U6.C4 U6.C12 U6.C14 U6.D1 U6.D2 U6.D12 U6.D13 U6.D14 U6.E2 U6.E11 U6.E12 U6.F1 U6.F4 U6.F7 U6.F11 U6.F12 U6.F13 U6.G1 U6.G4 U6.G7 U6.G8 U6.G11 U6.H1 U6.H2 U6.H3 U6.H4 U6.H7 U6.H8 U6.H11 U6.H12 U6.H13 U6.H14 U6.J1 U6.J2 U6.J3 U6.J4 U6.J7 U6.J8 U6.J11 U6.J12 U6.J13 U6.K3 U6.K4 U6.K11 U6.K12 U6.L1 U6.L2 U6.L3 U6.L5 U6.L7 U6.L12 U6.L13 U6.L14 U6.M1 U6.M2 U6.M3 U6.M4 U6.M5 U6.M7 U6.M8 U6.M9 U6.M10 U6.M11 U6.M12 U6.M13 U6.M14 U6.N1 U6.N4 U6.N7 U6.N10 U6.N11 U6.N14 U6.P2 U6.P3 U6.P4 U6.P5 U6.P8 U6.P9 U6.P10 U6.P11 U6.P12 U6.P13 U8.1 U8.2 U8.3 U8.4 U8.5 U8.6 U8.7 U8.8 U8.9 U8.15 U8.16 U8.17 U8.18 U8.23 U8.24 U8.29 U8.35 U8.36 U8.37 U8.38 U8.39 U8.40 U8.41 U8.42 U8.43 U8.44 U8.45 U8.46 U8.47 U8.48 U8.54 U8.55 U8.56 U8.57 U8.58 U8.59 U8.60 U8.61 U8.62 U8.63 U8.64 U8.65 U8.66 U8.67 U8.68 U8.69 U8.77 U8.78 U8.79 U8.80 U8.81 U8.82 U8.83 U8.84 U8.85 U8.86 U8.87 U8.88 U8.89 U8.90 U8.91 U8.92 U8.93 U8.95 U8.96 U8.97 U8.98 U9.1 U9.5 U9.8
copper on no net: | length 0
  L1 w0.3: 37.839,24.671 37.857,24.671

## Polygon pours and split planes (outlines as drawn)
GND on L1 "BOTTOM_LAYER_5V_FLOOD_2" (solid, pour order 0): -0.635,-0.483 90.322,-0.483 90.322,58.928 -0.406,58.928 -0.533,59.055 -0.533,-0.483 -0.432,-0.584
GND on L6 "BOTTOM_LAYER_5V_FLOOD_2" (solid, pour order 1): -0.635,-0.483 90.322,-0.483 90.424,-0.584 90.424,59.055 -0.432,59.055 -0.533,59.157 -0.533,0.152 -0.635,0.051
GND on GND1 (split plane): 89.272,0.281 0.292,0.281 0.292,58.036 89.272,58.036
+1V8 on 1.8V (split plane): 89.272,0.281 0.292,0.281 0.292,58.036 89.272,58.036
+1V0 on 1.8V (split plane): 41.153,30.492 41.153,22.746 41.153,22.3 41.028,22.175 38.536,22.175 38.511,22.2 38.511,26.292 39.674,27.454 39.702,27.496 39.711,27.546 39.711,30.592 39.736,30.617 41.028,30.617
+1V0 on 1.8V (split plane): 41.432,26.926 41.482,26.917 43.728,26.917 44.49,26.154 44.532,26.126 44.582,26.117 45.628,26.117 45.853,25.892 45.853,24.7 45.728,24.575 44.482,24.575 44.432,24.566 44.39,24.538 43.49,23.638 43.462,23.596 43.453,23.546 43.453,23.2 42.628,22.375 41.411,22.375 41.411,22.746 41.411,26.94
+3V3 on +3V3 (split plane): 89.272,0.281 0.292,0.281 0.292,58.036 89.272,58.036
GND on GND (split plane): 89.272,0.281 0.292,0.281 0.292,58.036 89.272,58.036

## Other copper
1.8V (plane layer: these items are gaps in the copper):
  lines w0.254: 41.482,27.046 42.782,27.046 43.782,27.046 44.582,26.246 45.682,26.246 45.982,25.946 45.982,24.646 45.782,24.446 44.482,24.446 43.582,23.546 43.582,23.146 42.682,22.246 41.282,22.246 ; 41.282,22.246 41.082,22.046 38.482,22.046 38.382,22.146 38.382,26.346 39.582,27.546 39.582,30.646 39.682,30.746 41.082,30.746 41.282,30.546 41.282,22.746 41.282,22.246

## Silkscreen, mask and mechanical layers (free items; w line width, h text height)
Top Overlay:
  circle w0.2: c46.398,51.698 r0.1
Mechanical 1:
  lines w0.254: 33.282,18.021 33.357,34.896 ; -0.218,-0.229 89.782,-0.229 89.782,58.546 -0.218,58.546 -0.218,-0.229

## Text inside footprints (layer, text, board x,y; h text height)
J1: Mechanical 13 "PCB EDGE" at 88.482,17.946 h1 r90
U2: Top Overlay "*" at 42.307,9.889 h1 r180; Mechanical 13 "*" at 41.169,11.068 h1 r180
U6: Top Overlay "14" at 49.492,34.312 h1 r90; Top Overlay "1" at 36.492,34.312 h1 r90; Top Overlay "P" at 33.581,19.036 h1; Top Overlay "A" at 33.581,32.036 h1; Mechanical 13 "14" at 49.492,34.312 h1 r90; Mechanical 13 "1" at 36.492,34.312 h1 r90; Mechanical 13 "P" at 33.581,19.036 h1; Mechanical 13 "A" at 33.581,32.036 h1; Bottom Overlay "14" at 48.222,34.312 h1 r270; Bottom Overlay "1" at 35.222,34.312 h1 r270; Bottom Overlay "P" at 34.216,19.036 h1; Bottom Overlay "A" at 34.216,32.036 h1
U9: Top Overlay "*" at 13.247,43.978 h1 r270; Mechanical 13 "*" at 13.247,43.977 h1 r270
U11: Mechanical 13 "*" at 17.482,21.667 h1 r180; Mechanical 13 "*" at 17.481,21.667 h1 r180; Mechanical 13 "*" at 17.478,21.671 h1 r180